# Altium PCB 0.PCB1.PcbDoc (part 5 of 12)
Units mm, origin at the board's own origin, x right, y up, seen from the top; angles counter-clockwise.
Board outline 77 x 72 mm, 6 copper layers (Top Layer, Layer 1, Layer 3, Layer 4, Layer 2, Bottom Layer), stack 1.538 mm thick; 570 components, 490 nets, 3331 pads, 1909 vias.
Unrouted connection lines stored in the file: 2.
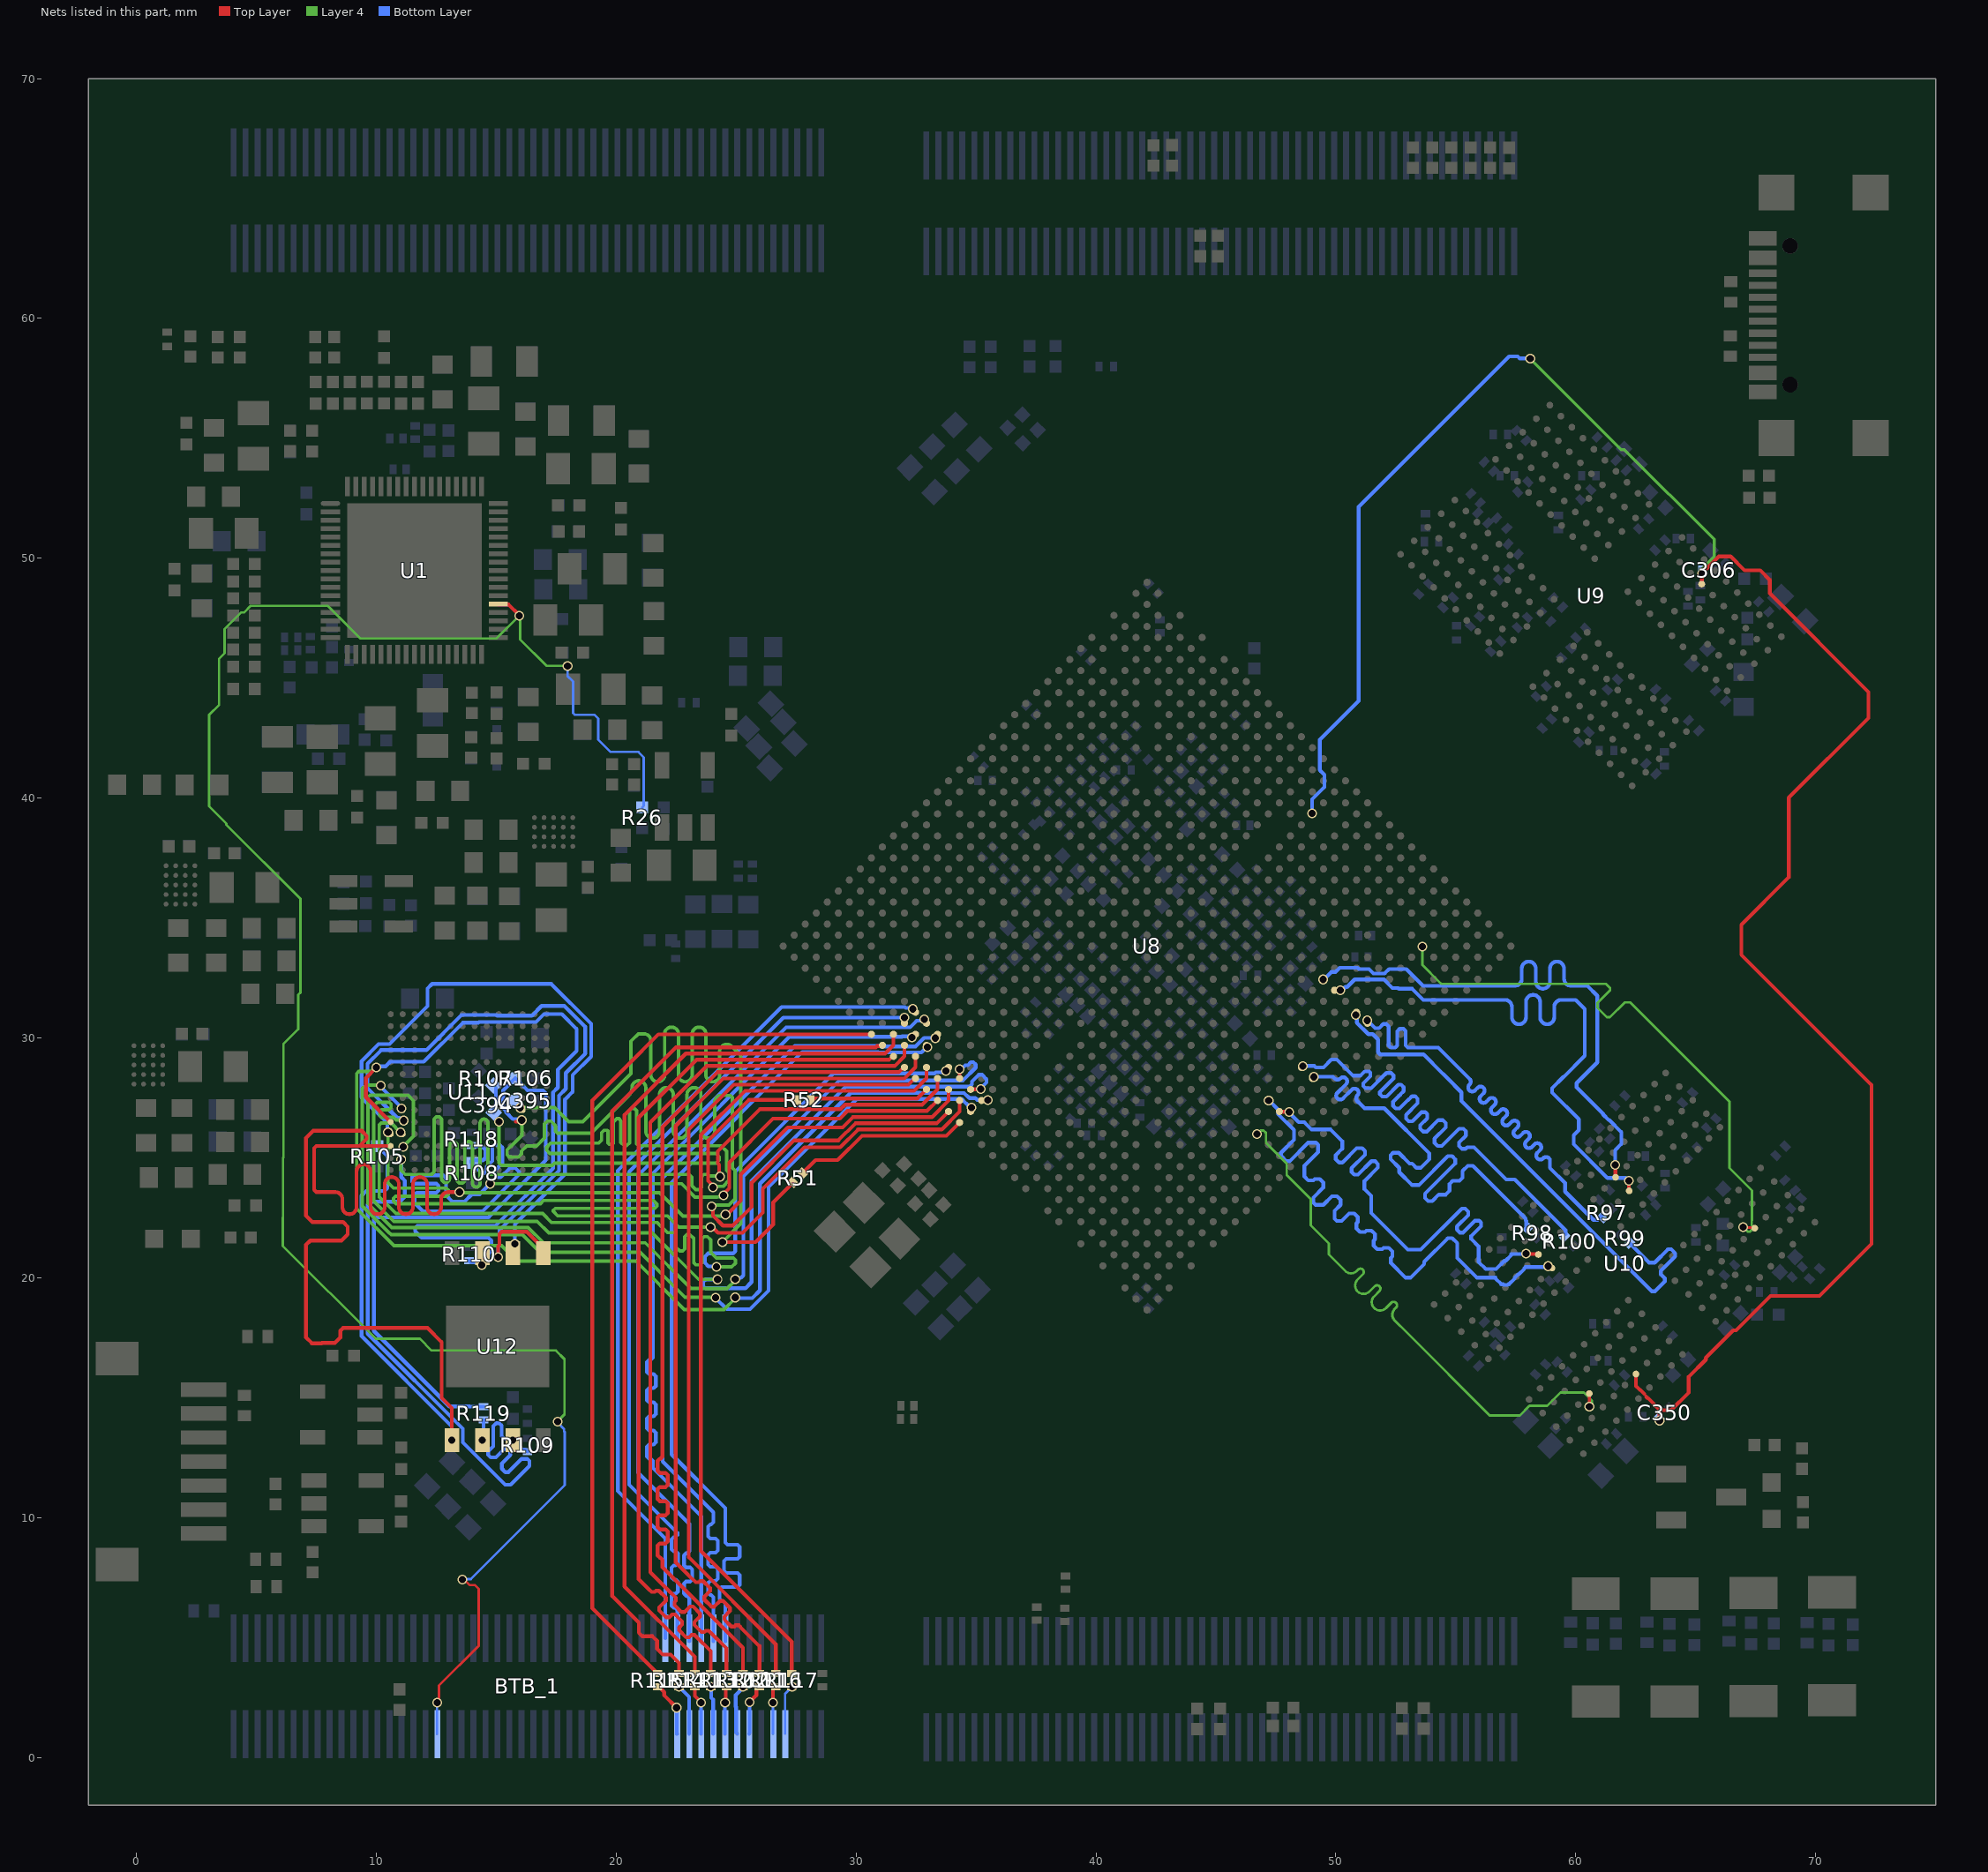
[diagram p9: the nets of this part, all layers, seen from the top]

## Via types
v1: diameter 0.41, hole 0.3, Top Layer to Bottom Layer, tented both sides, 1901 vias
v2: diameter 0.41, hole 0.3, Top Layer to Bottom Layer, 8 vias

## Nets (pads, with @x,y where several pads share a name; then routed paths per layer and width w, separated by ;. In a path a pad name is that pad's centre, name@x,y a point inside that pad or via, vN(x,y) a via of type N, cw(c..) or ccw(c..) an arc to the next point about the centre after c; other vN are vias at no path point) (continued)
DDR_CH1_DQS1P_C: U8.E5 U10.D10 | length 24.3
  Top Layer w0.112: v1(66.981,22.11) 67.004,22.088 U10.D10@67.441,22.088 ; U10.D10@67.443,22.088 U10.D10@67.441,22.088 ; U10.D10@67.463,22.065 U10.D10@67.441,22.088
  Layer 4 w0.105: v1(53.612,33.805) 53.612,33.042 54.331,32.323 54.4,32.254 61.258,32.254 61.437,32.076 61.437,31.989 60.908,31.461 60.908,31.247 61.295,30.861 61.432,30.861 62.049,31.479 62.272,31.479 66.408,27.343 66.408,24.574 67.344,23.638 67.344,22.39 67.342,22.388 67.342,21.997 67.261,21.915 67.177,21.915 67.065,22.027 v1@66.974,22.027
DDR_CH1_DQS1P_D: U8.D21 U10.W10 | length 24.6
  Top Layer w0.112: U10.W10@60.569,15.171 60.571,15.169 60.571,14.63 v1(60.573,14.628)
  Layer 4 w0.105: v1@46.768,26.073 46.814,26.073 v1@46.858,26.118 ; v1@46.855,26.122 46.87,26.137 46.989,26.137 47.092,26.034 47.092,25.62 47.953,24.759 47.953,24.277 48.955,23.275 48.955,22.183 49.709,21.429 49.709,20.964 50.276,20.396 50.385,20.287 ccw(c50.632,20.532) 50.879,20.287 50.929,20.337 cw(c51.028,20.236) 51.128,20.136 ; 50.91,19.919 ccw(c51.156,19.672) 50.91,19.426 ccw(c51.156,19.672) 51.402,19.426 51.62,19.645 cw(c51.72,19.545) 51.819,19.645 ; 50.91,19.919 51.127,20.136 ; 51.82,19.644 cw(c51.72,19.545) 51.819,19.444 51.602,19.227 ccw(c51.847,18.98) 51.602,18.734 ccw(c51.847,18.98) 52.093,18.734 52.312,18.953 cw(c52.412,18.853) 52.511,18.753 ; 52.511,18.752 52.462,18.703 ccw(c52.708,18.457) 52.462,18.21 52.963,17.709 56.412,14.26 57.677,14.26 58.073,14.656 58.816,14.656 59.372,15.212 60.345,15.212 60.675,14.882 v1@60.675,14.73 ; v1@60.548,14.704 v1@60.573,14.73 ; v1@60.599,14.73 v1@60.624,14.755
  other v1: 46.709,25.99
DDR_CH1_LP4/4X_CKE0_C: R97.1 U8.D11 | length 20.3
  Bottom Layer w0.156: v1(51.317,30.725) 51.64,30.402 51.803,30.402 51.978,30.577 52.1,30.577 52.204,30.473 52.204,29.683 52.296,29.591 52.478,29.591 52.565,29.678 52.565,30.277 52.664,30.376 52.818,30.376 52.91,30.285 52.91,29.683 53.002,29.591 53.324,29.591 ; 53.324,29.594 54.274,29.594 55.284,28.583 55.34,28.528 55.576,28.292 cw(c55.458,28.174) 55.576,28.055 55.569,28.048 ccw(c55.687,27.93) 55.569,27.812 ccw(c55.687,27.93) 55.805,27.812 55.917,27.923 cw(c56.035,27.805) 56.153,27.923 cw(c56.035,27.805) 56.153,27.687 56.041,27.575 ccw(c56.159,27.457) 56.041,27.339 ccw(c56.159,27.457) 56.278,27.339 56.389,27.451 cw(c56.508,27.333) 56.626,27.451 cw(c56.508,27.333) 56.626,27.214 56.514,27.103 ccw(c56.632,26.984) 56.514,26.866 ccw(c56.632,26.984) 56.75,26.866 56.862,26.978 cw(c56.98,26.86) 57.099,26.978 cw(c56.98,26.86) 57.099,26.742 56.987,26.63 ccw(c57.105,26.512) 56.987,26.393 ccw(c57.105,26.512) 57.223,26.393 57.335,26.505 cw(c57.453,26.387) 57.571,26.505 cw(c57.453,26.387) 57.571,26.269 57.459,26.157 ccw(c57.578,26.039) 57.459,25.921 ccw(c57.578,26.039) 57.696,25.921 57.808,26.033 cw(c57.926,25.914) 58.044,26.033 cw(c57.926,25.914) 58.044,25.796 57.932,25.684 ccw(c58.05,25.566) 57.932,25.448 ccw(c58.05,25.566) 58.168,25.448 58.28,25.56 cw(c58.399,25.442) 58.517,25.56 cw(c58.399,25.442) 58.517,25.324 58.405,25.212 ccw(c58.523,25.093) 58.405,24.975 ccw(c58.523,25.093) 58.641,24.975 58.649,24.983 cw(c58.767,24.865) 58.885,24.983 58.928,24.939 58.928,24.644 58.928,24.58 59.557,23.951 59.557,23.592 60.736,22.413 60.915,22.413 61.063,22.561 61.086,22.584 R97.1@61.086,22.602
DDR_CH1_LP4/4X_CKE0_D: R98.1 U8.D16 | length 22.9
  Bottom Layer w0.156: v1(49.086,28.37) 49.097,28.381 49.881,28.381 49.899,28.363 49.954,28.308 ccw(c50.072,28.426) 50.191,28.308 ; 50.191,28.309 cw(c50.309,28.19) 50.427,28.309 cw(c50.309,28.19) 50.427,28.072 50.068,27.712 ccw(c50.186,27.594) 50.068,27.476 ccw(c50.186,27.594) 50.304,27.476 50.664,27.836 cw(c50.782,27.718) 50.9,27.836 cw(c50.782,27.718) 50.9,27.599 ; 50.9,27.599 ccw(c51.018,27.481) 50.9,27.363 51.05,27.212 51.105,27.157 51.197,27.065 52.017,27.065 53.9,25.183 53.9,24.939 53.54,24.58 53.361,24.58 53.181,24.76 53.073,24.76 52.625,25.207 52.387,25.207 52.285,25.106 52.285,24.946 52.647,24.584 ; 52.656,24.575 52.647,24.584 ; R98.1@57.941,22.011 57.941,22.367 57.918,22.39 57.918,22.465 55.714,24.67 55.501,24.67 55.284,24.453 55.284,24.168 55.157,24.041 54.872,24.041 54.745,23.914 54.745,23.63 54.581,23.465 54.296,23.465 54.027,23.196 53.847,23.196 53.72,23.323 53.72,23.502 54.977,24.76 54.977,24.939 54.85,25.066 54.67,25.066 53.466,23.862 53.181,23.862 52.642,24.4 52.642,24.58 52.647,24.584
DDR_CH1_LP4/4X_CKE1_C: R99.1 U8.E11 | length 22.5
  Bottom Layer w0.156: v1@50.794,30.91 50.802,30.91 50.875,30.837 50.875,30.636 51.358,30.154 51.544,30.154 51.763,29.934 51.763,29.401 51.855,29.309 53.017,29.309 ; 53.022,29.304 53.017,29.309 ; R99.1@62.248,21.44 63.058,20.63 63.294,20.63 63.85,21.186 63.979,21.186 64.152,21.014 64.152,20.884 63.552,20.284 63.552,20.136 63.715,19.973 63.715,19.843 63.306,19.434 63.177,19.434 61.102,21.508 58.448,24.162 55.239,27.371 55.239,27.73 54.648,28.322 54.648,28.326 54.466,28.508 54.462,28.508 53.66,29.309 53.017,29.309
  other v1: 50.827,30.954
DDR_CH1_LP4/4X_CKE1_D: R100.1 U8.E16 | length 24.2
  Bottom Layer w0.156: v1(48.621,28.821) 48.631,28.83 49.106,28.83 49.165,28.771 49.487,28.771 49.814,29.098 50.046,29.098 50.72,28.423 51.023,28.423 51.206,28.606 51.389,28.606 51.442,28.552 51.442,28.403 51.148,28.109 51.148,27.995 51.241,27.903 51.475,27.903 51.942,28.37 ; 51.935,28.362 51.942,28.37 ; 52.626,27.577 52.678,27.629 ; 53.022,27.407 53.055,27.44 ; R100.1@59.578,21.811 59.578,21.983 57.466,24.095 57.107,24.095 55.76,25.442 55.48,25.442 55.407,25.37 55.265,25.37 55.138,25.497 55.138,25.639 55.426,25.927 55.426,26.107 55.321,26.212 55.142,26.212 54.423,25.493 54.244,25.493 54.116,25.62 54.116,25.8 54.583,26.267 54.583,26.446 54.456,26.574 54.277,26.574 53.792,26.089 53.65,26.089 53.522,26.216 53.522,26.358 53.81,26.645 53.81,26.825 53.734,26.901 53.576,26.901 53.195,26.52 53.037,26.52 52.925,26.632 52.925,26.79 53.41,27.275 53.41,27.465 53.31,27.566 53.18,27.566 53.055,27.44 ; 51.942,28.37 52.112,28.54 52.306,28.54 52.408,28.437 52.408,28.308 51.836,27.736 51.836,27.658 51.937,27.557 52.115,27.557 52.61,28.052 52.722,28.052 52.829,27.945 52.829,27.78 52.678,27.629 ; 52.678,27.629 52.678,27.62 52.387,27.328 52.387,27.171 52.498,27.059 52.656,27.059 53.037,27.44 53.055,27.44
DDR_CH1_LP4/4X_CS0_C: U8.G11 U10.H4 | length 24.5
  Top Layer w0.156: v1(62.214,24.046) 62.209,24.041 62.218,24.032 62.218,23.633 U10.H4@62.23,23.621
  Bottom Layer w0.156: v1(50.193,31.987) 50.261,31.987 50.4,32.126 50.477,32.126 50.785,32.434 52.006,32.434 52.359,32.081 52.594,32.081 52.629,32.047 53.186,32.047 53.648,31.585 56.381,31.585 57.048,31.585 cw(c57.048,31.291) 57.342,31.291 57.342,30.863 ccw(c57.636,30.863) 57.93,30.863 57.93,31.5 cw(c58.224,31.5) 58.518,31.5 58.518,30.863 ccw(c58.812,30.863) 59.106,30.863 59.106,31.291 cw(c59.401,31.291) 59.401,31.585 60,31.585 60.197,31.387 60.383,31.202 60.383,29.256 59.494,28.367 ; 59.488,28.373 59.018,27.903 59.018,27.723 60.132,26.609 60.132,26.161 59.917,25.946 59.917,25.567 61.322,24.162 62.095,24.162 62.211,24.046 62.212,24.045 v1(62.214,24.046)
DDR_CH1_LP4/4X_CS0_D: U8.E19 U10.R4 | length 24.4
  Bottom Layer w0.156: v1(47.201,27.388) 47.227,27.388 47.602,27.013 47.602,26.818 48.256,26.164 48.256,25.753 47.714,25.211 47.714,25.082 47.94,24.856 48.07,24.856 48.849,25.634 49.166,25.634 49.258,25.542 49.258,25.236 48.691,24.67 48.691,24.221 48.853,24.059 49.063,24.059 49.122,24.118 49.333,24.118 49.481,23.969 49.481,23.759 49.064,23.342 49.064,23.132 49.156,23.041 49.481,23.041 49.84,23.4 50.051,23.4 50.2,23.251 50.2,23.04 49.946,22.787 49.946,22.457 50.037,22.365 50.243,22.365 50.559,22.681 50.769,22.681 50.918,22.533 50.918,22.322 50.859,22.263 50.859,22.053 51.008,21.904 51.218,21.904 51.277,21.963 51.488,21.963 51.637,21.814 51.637,21.604 51.578,21.545 51.578,21.334 51.726,21.185 51.937,21.185 51.996,21.244 52.206,21.244 52.355,21.096 52.355,20.885 52.296,20.826 52.296,20.616 52.912,20 53.115,20 53.684,20.569 53.684,20.665 54.672,21.652 54.851,21.652 55.062,21.442 55.062,20.824 55.886,20 56.666,20 56.666,19.963 56.897,19.732 56.975,19.732 57.003,19.704 57.166,19.704 57.194,19.732 57.224,19.732 57.455,19.963 57.455,19.992 57.599,20.137 57.627,20.137 57.858,20.368 57.858,20.396 57.911,20.449 58.812,20.449 v1(58.846,20.483)
DDR_CH1_LP4/4X_CS1_C: U8.H11 U10.H3 | length 24.4
  Top Layer w0.156: v1(61.647,24.701) 61.656,24.692 61.656,24.188 U10.H3@61.691,24.153
  Bottom Layer w0.156: v1@49.49,32.493 49.561,32.493 49.817,32.748 49.989,32.748 50.166,32.925 50.918,32.925 50.973,32.87 51.383,32.87 51.572,32.682 52.034,32.682 52.223,32.87 52.937,32.87 53.638,32.169 57.378,32.169 57.456,32.169 ccw(c57.456,32.464) 57.75,32.464 57.75,32.891 cw(c58.044,32.891) 58.339,32.891 58.339,32.346 ccw(c58.633,32.346) 58.927,32.346 58.927,32.891 cw(c59.221,32.891) 59.515,32.891 59.515,32.464 ccw(c59.809,32.464) 59.809,32.169 60.228,32.169 60.489,32.169 60.905,31.754 60.905,28.978 60.703,28.776 ; 60.701,28.777 60.04,28.116 60.04,27.936 61.144,26.832 61.144,26.809 61.375,26.578 61.398,26.578 61.907,26.069 61.907,25.58 61.647,25.32 v1@61.647,24.696
  other v1: 49.478,32.437
DDR_CH1_LP4/4X_CS1_D: U8.D19 U10.R3 | length 23.2
  Top Layer w0.156: U8.D19@47.646,26.931 47.654,26.923 48.048,26.923 v1(48.056,26.915) ; v1@57.881,21.004 57.898,20.986 58.43,20.986 U10.R3@58.447,20.969
  Bottom Layer w0.156: v1(48.056,26.915) 48.056,26.884 48.45,26.49 48.686,26.49 48.997,26.179 49.787,26.179 50.268,25.697 50.268,25.377 49.997,25.106 49.997,24.946 50.143,24.8 50.272,24.8 50.87,25.398 51.1,25.398 51.218,25.28 51.218,25.128 50.657,24.568 50.657,24.41 50.769,24.298 50.927,24.298 51.487,24.859 51.639,24.859 51.757,24.741 51.757,24.59 51.196,24.029 51.196,23.692 51.475,23.413 51.475,22.694 53.002,21.168 53.54,21.168 55.256,22.883 55.392,22.883 55.519,22.756 55.519,22.604 55.05,22.135 55.05,22.006 55.174,21.881 55.304,21.881 55.798,22.375 55.976,22.375 56.052,22.299 56.052,22.147 55.647,21.742 55.647,21.612 55.95,21.308 55.95,20.661 56.252,20.359 56.683,20.359 57.025,20.701 57.076,20.701 57.307,20.932 57.307,20.983 57.309,20.985 v1@58.028,20.985
  other v1: 57.932,21.004
DDR_RESET: C306.2 C350.2 U8.T4 U9.T11 U10.T11 | length 88.1
  Top Layer w0.156: U10.T11@62.513,15.984 62.513,15.482 62.675,15.321 62.695,15.321 62.857,15.159 62.859,15.162 ; 62.935,15.035 62.969,15.001 62.978,15.001 63.011,14.969 63.022,14.969 63.487,14.503 63.487,14.051 v1(63.494,14.044) ; 63.494,14.476 63.977,14.476 64.713,15.212 64.713,15.873 65.425,16.584 65.425,16.66 66.568,17.803 66.684,17.803 68.117,19.236 70.16,19.236 72.336,21.412 72.336,28.037 66.91,33.462 66.91,34.719 68.882,36.69 68.882,40.013 72.206,43.338 72.206,44.422 68.092,48.537 68.092,49.096 67.693,49.495 67.042,49.495 66.461,50.075 65.973,50.075 65.695,49.798 65.69,49.798 65.508,49.617 65.508,49.611 v1@65.27,49.372 ; U9.T11@65.252,48.923 65.263,48.933 v1@65.263,49.366
  Layer 4 w0.127: v1(58.109,58.318) 61.902,54.524 62.03,54.524 65.77,50.785 65.77,50.066 65.274,49.57 v1(65.274,49.368)
  Bottom Layer w0.156: v1(49.015,39.356) 49.015,39.951 49.524,40.46 49.524,40.968 49.372,41.12 ; 49.378,41.127 49.334,41.171 49.334,42.434 50.95,44.05 50.95,52.146 57.223,58.419 57.581,58.419 57.669,58.331 58.096,58.331 v1(58.109,58.318)
EMMC_CLKOUT: C395.2 R51.2 U11.M6 | length 36.1
  Top Layer w0.156: v1(15.999,27.082) 16.091,26.991 U11.M6@16.102,26.991 ; v1(24.429,21.486) 25.813,21.486 26.549,22.222 26.549,23.144 R51.2@27.379,23.974 27.344,24.009 27.242,24.009 R51.2@27.207,23.974
  Layer 4 w0.142: v1(15.999,27.082) 16.012,27.094 17.439,27.094 18.028,26.505 18.61,26.505 20.616,28.512 20.616,29.858 20.658,29.899 20.926,30.168 21.16,30.168 cw(c21.16,29.881) 21.447,29.881 21.447,28.456 ccw(c21.734,28.456) 22.021,28.456 22.021,30.162 cw(c22.308,30.162) 22.595,30.162 22.595,28.456 ccw(c22.883,28.456) 23.17,28.456 23.17,30.162 cw(c23.457,30.162) 23.744,30.162 23.744,28.456 ccw(c24.031,28.456) 24.318,28.456 24.318,29.443 cw(c24.605,29.443) 24.808,29.646 24.988,29.467 25.192,29.262 25.192,22.25 v1(24.429,21.486)
EMMC_CLKOUT_R: R51.1 U8.V34 | length 7.4
  Top Layer w0.156: R51.1@27.768,24.363 28.311,24.906 29.233,24.906 30.248,25.921 33.766,25.921 U8.V34@34.317,26.472
EMMC_D4: U8.Y32 U11.B3 | length 43
  Top Layer w0.156: U8.Y32@34.317,28.31 v1(34.317,28.691)
  Layer 4 w0.142: v1(11.128,25.453) 11.128,25.479 11.551,25.902 11.551,27.379 11.323,27.608 9.735,27.608 9.652,27.524 9.652,23.095 10.651,22.096 16.326,22.096 16.966,21.456 21.213,21.456 23.121,19.548 24.122,19.548 ; 24.122,19.552 24.628,19.552 24.966,19.89 v1(24.966,19.944)
  Bottom Layer w0.156: v1(24.966,19.944) 25.015,19.992 25.206,19.992 25.308,20.094 25.308,24.226 29.309,28.228 34.458,28.228 34.99,28.76 34.99,28.885 34.891,28.984 34.782,28.984 34.661,28.863 34.558,28.863 34.384,28.69 v1@34.332,28.69 ; v1(34.317,28.691) v1@34.355,28.691
EMMC_D5: U8.AA32 U11.B4 | length 40.8
  Layer 4 w0.142: v1(11.017,26.066) 10.999,26.066 10.621,26.444 10.203,26.444 10.12,26.361 10.12,23.381 10.821,22.68 16.931,22.68 17.309,22.302 21.724,22.302 ; 21.752,22.263 22.138,21.877 22.41,21.877 22.499,21.788 22.499,21.265 22.65,21.114 22.768,21.114 22.852,21.197 22.852,21.705 22.949,21.802 23.067,21.802 23.238,21.631 23.238,20.62 23.321,20.536 23.497,20.536 23.581,20.62 23.581,21.631 23.664,21.715 23.804,21.715 23.944,21.575 23.944,21.052 24.172,20.823 24.889,20.823 24.973,20.74 24.973,20.605 24.816,20.449 v1(24.188,20.449)
  Bottom Layer w0.156: v1(24.188,20.449) v1@24.266,20.449 ; v1@24.266,20.468 24.259,20.475 23.842,20.475 23.7,20.618 23.7,20.882 23.835,21.016 24.876,21.016 24.967,21.108 24.967,24.43 29.057,28.52 33.273,28.52 33.319,28.566 33.688,28.566 v1(33.744,28.622)
EMMC_D7: U8.V33 U11.B6 | length 40.5
  Layer 4 w0.142: v1(10.181,28.017) 10.161,28.037 9.576,28.037 9.418,27.88 9.418,22.998 10.523,21.893 10.625,21.792 16.09,21.792 16.82,21.062 20.995,21.062 22.867,19.19 24.131,19.19 v1(24.15,19.171)
  Bottom Layer w0.156: v1(10.181,28.017) 10.181,27.954 11.047,27.089 v1(11.047,27.062) ; v1(24.15,19.171) 24.15,19.149 24.612,18.687 25.579,18.687 26.357,19.464 26.357,23.777 30.033,27.454 32.254,27.454 34.401,27.454 34.58,27.275 34.582,27.275 34.761,27.097 v1(34.808,27.097)
EMMC_DATA_STROBE: R108.2 R118.1 U8.Y34 | length 40.7
  Top Layer w0.156: v1(24.478,23.43) 24.478,23.498 24.713,23.734 24.713,24.806 26.54,26.633 29.328,26.633 29.648,26.953 32.96,26.953 U8.Y34@33.398,27.391
  Layer 4 w0.142: v1(14.749,23.92) 22.732,23.92 23.286,23.365 24.201,23.365 24.206,23.371 24.419,23.371 v1(24.478,23.43)
  Bottom Layer w0.156: R108.2@13.967,24.872 13.967,24.814 R108.2@13.992,24.789 ; R118.1@13.967,25.509 14,25.476 14.402,25.476 14.559,25.319 14.559,25.177 14.556,25.174 14.556,25.009 14.442,24.895 14.002,24.895 R108.2@13.979,24.872 ; R108.2@14.011,24.77 14.306,24.475 ; 14.292,24.461 14.392,24.361 14.521,24.361 14.613,24.452 14.613,24.642 14.835,24.865 14.835,25.479 14.886,25.53 15.155,25.53 15.261,25.425 15.261,25.102 15.262,25.101 15.262,24.788 14.928,24.454 14.928,24.325 15.067,24.186 15.181,24.186 15.569,24.575 15.798,24.575 15.949,24.424 15.949,24.294 14.414,22.759 11.996,22.759 11.98,22.774 11.942,22.774 11.594,23.122 11.594,23.454 11.686,23.546 12.503,23.546 12.595,23.638 12.595,23.831 12.501,23.925 11.572,23.925 11.493,24.004 11.493,24.219 11.546,24.273 12.791,24.273 12.908,24.156 12.908,23.442 13.169,23.18 13.682,23.18 13.982,23.48 14.31,23.48 v1(14.749,23.92) v1@14.701,23.968
EMMC_RSTN: C394.2 R52.2 R107.2 U11.K5 | length 41.6
  Top Layer w0.156: v1(24.037,23.763) 24.037,23.832 23.829,24.04 23.829,25.72 25.521,27.412 R52.2@27.558,27.412
  Layer 4 w0.142: v1(15.11,26.509) 15.116,26.503 15.116,24.787 15.2,24.703 ; 15.237,24.682 17.337,24.682 17.429,24.773 24.157,24.773 24.292,24.908 24.292,25.045 24.155,25.182 17.233,25.182 17.095,25.32 17.095,25.438 17.271,25.614 19.278,25.614 19.392,25.728 19.392,26.048 19.489,26.145 19.631,26.145 19.656,26.119 19.656,25.614 19.705,25.565 19.847,25.565 19.885,25.604 19.885,26.493 20.025,26.632 20.114,26.632 20.197,26.549 20.197,25.644 20.335,25.507 20.434,25.507 20.556,25.629 20.556,26.975 20.639,27.058 20.757,27.058 20.848,26.968 20.848,25.585 20.931,25.502 24.366,25.502 24.601,25.266 24.601,24.473 24.704,24.37 24.704,24.057 24.456,23.808 24.083,23.808 v1(24.037,23.763)
  Bottom Layer w0.156: C394.2@14.895,26.884 14.895,27.127 14.983,27.215 R107.2@14.983,27.913
EMMC_RSTN_R: R52.1 U8.AA34 | length 5
  Top Layer w0.156: R52.1@28.108,27.412 28.165,27.469 32.238,27.469 32.557,27.469 U8.AA34@32.938,27.85
EXT_PWR_EN: BTB_1.83 R26.2 U1.39 | length 87.1
  Top Layer w0.102: v1@12.618,2.335 12.608,2.345 12.608,2.449 12.618,2.459 12.618,2.995 14.269,4.646 14.269,7.025 14.107,7.186 13.888,7.186 13.66,7.415 v1(13.583,7.415)
  Top Layer w0.156: U1.39@15.091,48.089 15.112,48.067 15.517,48.067 15.957,47.626 v1(15.957,47.602)
  Layer 4 w0.102: v1(17.561,14.004) 17.561,14.017 17.847,14.302 17.847,16.602 17.484,16.965 12.305,16.965 11.818,17.451 9.979,17.451 6.105,21.325 6.105,22.503 6.116,22.513 6.116,25.003 6.127,25.014 6.127,29.737 6.751,30.361 6.751,31.802 6.836,31.886 6.836,35.804 3.753,38.886 3.753,38.936 3.033,39.657 3.033,43.473 3.449,43.889 3.449,45.81 3.674,46.035 3.674,47.046 4.363,47.735 4.48,47.735 4.76,48.015 6.993,48.015 7.975,48.015 9.335,46.655 15.01,46.655 15.963,47.608 16.001,47.57 16.001,46.614 17.103,45.512 17.967,45.512 v1(17.976,45.503)
  Bottom Layer w0.102: BTB_1.83@12.535,0.98 v1@12.535,2.282 ; v1(13.583,7.415) 13.603,7.434 13.944,7.434 17.859,11.35 17.859,13.567 17.829,13.597 17.829,13.691 17.561,13.959 v1(17.561,14.004) ; v1(17.976,45.503) 17.976,45.087 18.206,44.857 18.206,43.549 18.285,43.469 19.1,43.469 19.255,43.315 19.255,42.436 19.768,41.923 20.928,41.923 21.15,41.701 21.15,40.071 21.15,39.669 R26.2@21.085,39.604
  other v1: 12.541,2.288
FSPI_CLK_M0: R106.2 R119.2 U8.W34 U11.M5 | length 68.8
  Top Layer w0.156: 15.811,26.509 16.084,26.509 U11.M5@16.102,26.491 ; v1(23.975,22.968) 24.031,22.912 24.031,22.589 24.447,22.174 24.868,22.174 25.648,22.954 25.648,23.96 27.416,25.728 29.264,25.728 29.973,26.437 33.363,26.437 U8.W34@33.857,26.931
  Layer 4 w0.142: v1(16.063,26.571) 16.072,26.562 16.072,25.931 15.63,25.489 15.623,25.489 15.455,25.322 15.455,25.126 15.544,25.037 15.933,25.037 16.06,25.164 16.06,25.284 16.276,25.499 16.687,25.499 17.016,25.828 17.016,26.41 17.137,26.531 17.276,26.531 17.474,26.333 17.474,26.104 17.558,26.02 18.955,26.02 20.445,27.51 20.516,27.581 ccw(c20.17,27.928) 20.66,27.922 cw(c20.947,27.923) 21.234,27.923 21.234,26.107 ccw(c21.521,26.107) 21.809,26.107 21.809,27.637 cw(c22.096,27.637) 22.383,27.637 22.383,26.107 ccw(c22.67,26.107) 22.957,26.107 22.957,27.637 cw(c23.244,27.637) 23.531,27.637 23.531,26.107 ccw(c23.819,26.107) 24.106,26.107 24.106,27.31 cw(c24.393,27.31) 24.393,27.597 24.762,27.597 24.822,27.537 24.845,27.514 24.845,24.574 24.948,24.471 24.948,23.287 24.694,23.032 24.394,23.032 24.388,23.026 24.034,23.026 v1(23.975,22.968)
  Bottom Layer w0.156: R119.2@14.472,14.619 13.895,14.619 13.882,14.632 13.045,14.632 9.9,17.777 9.9,22.419 9.992,22.511 14.68,22.511 17.065,24.896 17.065,27.7 16.954,27.811 16.305,27.811 R106.2@15.796,28.319 15.288,27.811 15.288,27.084 15.418,26.954 15.418,26.892 15.691,26.62 16.015,26.62 v1(16.063,26.571)
FSPI_CLK_M0_R: R119.1 U12.6 | length 0.9
  Top Layer w0.156: U12.6@14.421,13.229 v1(14.421,13.231)
  Bottom Layer w0.156: v1(14.421,13.231) 14.421,13.27 14.472,13.321 R119.1@14.472,14.069
FSPI_CS0N_M0: U8.W32 U11.B5 U12.1 | length 70.1
  Top Layer w0.156: v1(15.083,20.854) 15.083,21.321 15.133,21.372 15.133,21.822 15.225,21.913 16.277,21.913 16.961,21.229 U12.1@16.961,21.029 ; U8.W32@34.739,27.864 34.745,27.858 35.193,27.858 v1(35.201,27.865)
  Layer 4 w0.142: v1(11.14,26.552) 11.12,26.572 10.824,26.572 10.7,26.696 10.467,26.696 10.456,26.686 10.228,26.686 10.144,26.769 10.144,26.922 10.228,27.006 10.528,27.006 10.619,27.097 10.619,27.235 10.536,27.318 10.042,27.318 9.886,27.161 9.886,23.192 10.728,22.35 16.707,22.35 17.19,21.867 21.5,21.867 23.438,19.93 v1(24.226,19.93)
  Bottom Layer w0.156: v1(11.14,26.552) 11.071,26.552 10.964,26.66 10.875,26.66 9.632,27.903 9.632,28.922 10.2,29.491 12.088,29.491 13.553,30.956 15.008,30.956 15.034,30.93 16.489,30.93 16.892,31.334 17.84,31.334 18.709,30.465 18.709,29.342 17.903,28.536 17.903,27.875 17.62,27.592 17.62,24.464 15.133,21.977 15.133,21.372 15.083,21.321 v1(15.083,20.854) ; v1@24.145,19.914 24.129,19.93 23.736,19.93 23.629,19.823 23.629,19.651 23.721,19.559 25.385,19.559 25.643,19.817 25.643,24.039 29.574,27.97 31.738,27.97 34.743,27.97 34.834,28.061 34.834,28.18 35.121,28.467 35.251,28.467 35.442,28.276 35.442,28.146 v1@35.31,28.014
FSPI_D0_M0: R105.2 U8.Y33 U11.A3 U12.5 | length 85.3
  Top Layer w0.156: U11.A3@10.602,25.491 9.302,25.491 ; v1(13.151,13.229) 13.151,14.567 12.727,14.992 12.727,17.314 12.133,17.907 8.618,17.907 8.503,17.793 8.503,17.506 8.278,17.28 7.744,17.28 7.731,17.267 7.312,17.267 7.071,17.509 7.071,21.369 7.251,21.55 8.551,21.55 8.808,21.806 8.808,22.131 8.618,22.322 7.337,22.322 7.071,22.589 7.071,25.827 7.37,26.127 9.406,26.127 9.406,26.108 9.598,25.916 9.598,25.786 9.302,25.491 ; v1(13.471,23.57) 13.078,23.57 13,23.57 ccw(c12.999,23.276) 12.705,23.276 12.705,22.943 cw(c12.411,22.943) 12.117,22.943 12.117,23.902 ccw(c11.823,23.902) 11.529,23.902 11.529,22.943 cw(c11.235,22.943) 10.941,22.943 10.941,23.902 ccw(c10.646,23.902) 10.352,23.902 10.352,22.943 cw(c10.058,22.943) 9.764,22.943 9.764,24.432 ccw(c9.47,24.432) 9.176,24.432 9.176,22.943 cw(c8.882,22.943) 8.588,22.943 8.588,23.276 ccw(c8.293,23.276) 8.293,23.57 7.576,23.57 7.497,23.57 7.406,23.662 7.406,25.399 7.498,25.491 9.302,25.491 ; v1(24.559,22.634) 24.619,22.634 25.196,23.211 25.196,24.308 27.156,26.268 29.439,26.268 29.866,26.695 33.168,26.695 33.857,27.384 U8.Y33@33.857,27.85
  Layer 4 w0.142: v1(13.471,23.57) 13.474,23.567 13.474,23.544 21.815,23.544 22.789,22.57 24.049,22.57 24.054,22.575 24.5,22.575 v1(24.559,22.634)
  Bottom Layer w0.156: R105.2@10.039,25.491 10.459,25.071 10.459,23.734 10.345,23.62 9.578,23.62 9.384,23.426 9.384,17.563 13.151,13.796 v1(13.151,13.229)
FSPI_D1_M0: U8.W33 U11.A4 U12.2 | length 69.4
  Top Layer w0.156: v1(23.937,22.112) 24.005,22.112 24.246,21.871 25.263,21.871 26.11,22.718 26.11,23.704 27.847,25.441 29.342,25.441 30.08,26.179 33.572,26.179 34.317,26.924 34.317,27.367 U8.W33@34.312,27.371
  Layer 4 w0.142: v1(10.487,26.058) 10.487,23.967 10.718,23.737 12.918,23.737 13.012,23.643 13.012,23.48 12.928,23.396 10.802,23.396 10.719,23.313 10.719,23.195 10.827,23.086 16.839,23.086 16.974,23.221 21.546,23.221 21.701,23.066 21.701,22.987 21.605,22.891 17.461,22.891 17.378,22.807 17.378,22.766 17.566,22.578 22.143,22.578 22.61,22.112 v1(23.937,22.112)
  Bottom Layer w0.156: v1(10.487,26.058) 10.459,26.086 10.459,26.446 9.384,27.521 9.384,29.025 10.097,29.739 10.55,29.739 12.138,31.326 12.138,32.063 12.328,32.253 17.29,32.253 18.957,30.587 18.957,29.217 18.188,28.448 18.188,27.75 17.868,27.43 17.868,24.315 15.78,22.227 v1(15.78,21.414)
FSPI_D2_M0: R110.2 U8.V32 U11.A5 U12.3 | length 71.8
  Top Layer w0.156: v1(10.006,28.767) 9.568,28.329 9.568,27.525 U11.A5@10.602,26.491
  Layer 4 w0.142: v1(10.006,28.767) 9.94,28.767 9.771,28.598 9.268,28.598 9.184,28.515 9.184,22.887 10.737,21.334 15.225,21.334 15.868,20.691 20.827,20.691 22.843,18.676 24.498,18.676 24.962,19.14 v1(24.962,19.174)
  Bottom Layer w0.156: v1(10.006,28.767) 10.055,28.816 10.393,28.816 10.581,29.004 11.978,29.004 13.604,30.63 14.249,30.63 14.282,30.663 16.659,30.663 16.987,30.991 17.734,30.991 18.351,30.374 18.351,29.454 17.571,28.674 17.571,27.93 17.372,27.731 17.372,24.566 14.965,22.159 11.714,22.159 11.623,22.068 11.623,21.938 11.886,21.674 14.673,21.674 14.801,21.546 14.801,21.117 14.671,20.986 14.671,20.864 14.409,20.602 v1@14.409,20.526 ; R110.2@13.868,20.708 13.94,20.637 14.222,20.637 14.355,20.503 v1@14.409,20.503 ; v1(24.962,19.174) 24.989,19.147 25.675,19.147 25.996,19.468 25.996,23.922 29.786,27.712 32.658,27.712 32.667,27.703 34.502,27.703 34.682,27.523 34.702,27.523 34.734,27.491 34.973,27.491 35.052,27.413 35.488,27.413 v1(35.497,27.404)
  other v1: 14.401,20.526
FSPI_D3_M0: R109.2 U8.AA33 U11.B2 U12.7 | length 68.7
  Top Layer w0.156: v1(24.326,24.213) 24.291,24.249 24.291,24.71 24.234,24.767 24.234,25.269 25.997,27.032 29.362,27.032 29.541,27.211 32.751,27.211 33.398,27.858 U8.AA33@33.398,28.31
  Layer 4 w0.142: v1@11.036,24.885 11.036,24.478 11.208,24.306 12.178,24.306 12.249,24.306 ccw(c12.249,24.466) 12.409,24.466 12.409,26.554 cw(c12.569,26.554) 12.729,26.554 12.729,24.131 ccw(c12.89,24.131) 13.05,24.131 13.05,25.51 cw(c13.21,25.51) 13.37,25.51 13.37,24.098 ccw(c13.53,24.098) 13.69,24.098 13.69,25.512 cw(c13.851,25.512) 14.011,25.512 14.011,23.938 ccw(c14.171,23.938) 14.331,23.938 14.331,26.452 cw(c14.491,26.452) 14.651,26.452 14.651,24.466 ccw(c14.811,24.466) 14.811,24.306 15.098,24.306 23.037,24.306 23.159,24.184 23.159,23.838 23.319,23.678 23.474,23.678 23.558,23.761 23.558,24.212 23.652,24.306 23.801,24.306 23.858,24.249 24.291,24.249 v1(24.326,24.213) ; v1(11.039,24.927) v1@11.058,24.908
  Bottom Layer w0.156: v1(11.039,24.927) 11.039,24.195 11.193,24.042 11.193,23.388 10.973,23.169 9.75,23.169 9.642,23.061 9.642,17.67 13.609,13.703 13.609,13.13 15.369,11.369 15.603,11.369 16.385,12.152 16.385,12.357 16.293,12.449 16.062,12.449 15.507,11.894 15.378,11.894 15.234,12.037 15.234,12.253 15.588,12.608 15.588,12.737 15.468,12.858 15.336,12.858 14.988,12.51 14.772,12.51 14.661,12.62 14.661,12.75 14.879,12.967 14.879,13.813 14.995,13.93 15.13,13.93 15.222,13.838 15.222,13.389 15.333,13.277 15.617,13.277 v1@15.643,13.252 ; v1(15.691,13.229) 16.1,12.82 16.229,12.82 R109.2@16.301,12.749
GMAC0_MCLKINOUT: BTB_1.63 R115.2 | length 2.3
  Top Layer w0.156: R115.2@21.751,2.97 22.007,2.715 22.007,2.582 v1(22.517,2.072)
  Bottom Layer w0.156: v1(22.517,2.072) 22.53,2.058 22.53,0.985 BTB_1.63@22.535,0.98
GMAC0_MCLKINOUT_R: R115.1 U8.AF34 | length 37.8
  Top Layer w0.156: R115.1@21.73,3.492 19.004,6.218 19.004,21.893 19.004,27.392 20.419,28.807 21.761,30.149 29.559,30.149 U8.AF34@30.64,30.149
GMAC0_MDC: BTB_1.55 R116.2 | length 2
  Top Layer w0.156: v1(26.541,2.288) 26.541,2.826 R116.2@26.657,2.942
  Bottom Layer w0.102: BTB_1.55@26.535,0.98 v1@26.535,2.282
GMAC0_MDC_R: R116.1 U8.AB34 | length 34.5
  Top Layer w0.156: R116.1@26.657,3.492 26.657,4.717 23.027,8.347 23.027,26.176 24.905,28.054 31.654,28.054 32.183,28.054 32.44,28.31 U8.AB34@32.479,28.31
GMAC0_MDIO: BTB_1.54 R117.2 | length 2.1
  Bottom Layer w0.102: BTB_1.54@27.044,0.988 27.044,2.655 v1(27.338,2.949)
GMAC0_MDIO_R: R117.1 U8.AB33 | length 34.9
  Top Layer w0.156: R117.1@27.318,3.492 27.318,4.821 23.532,8.606 23.532,25.951 25.376,27.796 31.912,27.796 32.416,27.796 32.938,28.317 U8.AB33@32.938,28.761
GMAC0_RXCLK: BTB_1.38 U8.AE32 | length 35.3
  Bottom Layer w0.156: BTB_1.38@22.551,4.995 22.551,6.065 22.551,6.144 22.459,6.235 22.397,6.235 22.309,6.324 22.309,6.735 22.397,6.824 22.483,6.824 22.571,6.912 22.571,7.324 22.483,7.412 22.397,7.412 22.309,7.5 22.309,7.912 22.397,8 22.483,8 22.571,8.088 22.571,8.5 22.483,8.588 22.397,8.588 22.309,8.677 22.309,9.088 22.397,9.177 22.459,9.177 22.551,9.268 22.551,9.352 22.551,9.361 20.54,11.372 20.54,24.417 26.972,30.849 v1(32.015,30.849)
GMAC0_RXD0: BTB_1.40 U8.AD32 | length 35.4
  Bottom Layer w0.156: BTB_1.40@23.551,4.843 23.551,10.048 21.533,12.065 21.533,12.284 21.533,12.362 21.442,12.454 21.368,12.454 21.279,12.542 21.279,12.954 21.368,13.042 21.561,13.042 21.65,13.13 21.65,13.542 21.561,13.63 21.368,13.63 21.279,13.718 21.279,14.13 21.368,14.218 21.561,14.218 21.65,14.307 21.65,14.718 21.561,14.807 21.368,14.807 21.279,14.895 21.279,15.307 21.368,15.395 21.561,15.395 21.65,15.483 21.65,15.895 21.561,15.983 21.368,15.983 21.279,16.072 21.279,16.483 21.368,16.572 21.442,16.572 21.533,16.663 21.533,17.149 21.533,24.356 27.221,30.044 31.905,30.044 31.925,30.064 32.291,30.064 v1(32.331,30.024)
GMAC0_RXD1: BTB_1.39 U8.AD31 | length 35.6
  Bottom Layer w0.156: BTB_1.39@23.051,4.843 23.051,6.574 23.051,6.652 22.959,6.744 22.918,6.744 22.829,6.832 22.829,7.244 22.918,7.332 23.083,7.332 23.171,7.42 23.171,7.832 23.083,7.92 22.918,7.92 22.829,8.009 22.829,8.42 22.918,8.509 22.959,8.509 23.051,8.6 23.051,8.76 23.051,9.732 20.911,11.872 20.911,24.26 27.093,30.442 32.252,30.442 32.527,30.717 32.791,30.717 v1(32.84,30.766)
GMAC0_RXD2: BTB_1.42 U8.AC32 | length 35.5
  Bottom Layer w0.156: BTB_1.42@24.551,4.843 24.551,6.343 24.551,6.421 24.459,6.513 24.397,6.513 24.309,6.601 24.309,7.013 24.397,7.101 25.062,7.101 25.15,7.189 25.15,7.601 25.062,7.689 24.584,7.689 24.496,7.777 24.496,8.189 24.584,8.277 25.062,8.277 25.15,8.366 25.15,8.777 25.062,8.866 24.643,8.866 24.551,8.957 24.551,9.947 24.551,10.391 22.316,12.627 22.316,23.97 27.757,29.411 30.919,29.411 30.94,29.391 32.727,29.391 32.945,29.609 v1(32.975,29.609)
GMAC0_RXD3: BTB_1.41 U8.AC31 | length 35.4
  Bottom Layer w0.156: BTB_1.41@24.051,4.843 24.051,6.602 24.051,6.68 23.959,6.772 23.921,6.772 23.833,6.86 23.833,7.272 23.921,7.36 24.15,7.36 24.238,7.448 24.238,7.86 24.15,7.948 23.921,7.948 23.833,8.036 23.833,8.448 23.921,8.536 24.15,8.536 24.238,8.625 24.238,9.037 24.15,9.125 23.921,9.125 23.833,9.213 23.833,9.625 23.921,9.713 23.959,9.713 24.051,9.805 24.051,10.155 24.051,10.218 21.935,12.335 21.935,24.158 27.446,29.669 31.012,29.669 31.042,29.639 32.476,29.639 32.698,29.86 32.835,29.998 33.297,29.998 v1(33.302,29.993)
GMAC0_RXDV_CRS: BTB_1.37 U8.AE31 | length 35.5
  Bottom Layer w0.156: BTB_1.37@22.051,4.97 22.051,9.13 20.068,11.113 20.068,21.893 20.068,24.463 20.419,24.814 26.895,31.29 28.417,31.29 32.035,31.29 32.071,31.254 32.32,31.254 v1(32.368,31.205)
GMAC0_TXCLK: BTB_1.61 R111.2 | length 2.1
  Top Layer w0.156: R111.2@23.279,2.942 23.279,2.557 23.541,2.295 v1(23.541,2.288)
  Bottom Layer w0.156: BTB_1.61@23.535,0.98 v1@23.535,2.282
GMAC0_TXCLK_R: R111.1 U8.AE33 | length 37.4
  Top Layer w0.156: R111.1@23.279,3.492 23.279,4.196 20.35,7.125 20.35,21.893 20.35,26.787 20.419,26.856 22.907,29.344 30.363,29.344 31.206,29.344 31.559,29.696 U8.AE33@31.559,30.149
GMAC0_TXD0: BTB_1.59 R112.2 | length 2
  Top Layer w0.156: v1(24.541,2.288) 24.57,2.318 24.57,2.913 R112.2@24.6,2.942
  Bottom Layer w0.156: BTB_1.59@24.535,0.98 v1@24.535,2.282
GMAC0_TXD0_R: R112.1 U8.AD33 | length 37.6
  Top Layer w0.156: R112.1@24.6,3.492 24.6,4.541 23.917,5.224 23.862,5.279 23.732,5.279 23.68,5.227 23.555,5.227 23.264,5.518 23.264,5.643 23.494,5.873 23.494,5.998 23.203,6.289 23.078,6.289 22.848,6.059 22.723,6.059 22.432,6.35 22.432,6.475 22.484,6.527 22.484,6.657 22.207,6.934 22.151,6.99 21.422,7.719 21.422,26.48 23.77,28.828 31.61,28.828 32.019,29.237 U8.AD33@32.019,29.689
GMAC0_TXD1: BTB_1.60 R113.2 | length 2
  Bottom Layer w0.156: v1(23.939,2.946) 23.966,2.92 23.966,2.487 24.044,2.409 BTB_1.60@24.044,0.988
GMAC0_TXD1_R: R113.1 U8.AD34 | length 37.4
  Top Layer w0.156: R113.1@23.939,3.496 23.939,4.432 23.325,5.046 23.27,5.101 23.14,5.101 23.044,5.005 22.919,5.005 22.628,5.296 22.628,5.421 22.75,5.542 22.75,5.667 22.458,5.958 22.334,5.958 22.212,5.837 22.087,5.837 21.796,6.128 21.796,6.253 22.075,6.531 22.075,6.656 21.783,6.947 21.659,6.947 21.606,6.895 21.477,6.895 21.372,7 21.316,7.055 20.939,7.432 20.939,26.678 23.347,29.086 31.377,29.086 31.521,29.229 U8.AD34@31.559,29.229
GMAC0_TXD2: BTB_1.57 R101.2 | length 2.1
  Top Layer w0.156: v1(25.567,2.303) 25.567,2.307 25.85,2.59 25.85,2.926 R101.2@25.87,2.946
  Bottom Layer w0.156: BTB_1.57@25.544,0.988 25.559,1.003 25.559,2.295 v1(25.567,2.303)
GMAC0_TXD2_R: R101.1 U8.AC33 | length 37.3
  Top Layer w0.156: R101.1@25.971,3.496 25.971,4.643 25.163,5.451 25.108,5.506 24.978,5.507 24.926,5.454 24.801,5.454 24.51,5.745 24.51,5.87 24.744,6.104 24.744,6.229 24.453,6.52 24.328,6.52 24.094,6.286 23.969,6.286 23.678,6.577 23.678,6.702 23.912,6.936 23.912,7.061 23.621,7.352 23.496,7.352 23.444,7.3 23.314,7.3 23.01,7.604 22.955,7.66 22.481,8.133 22.481,26.333 24.46,28.312 32.013,28.312 32.478,28.777 U8.AC33@32.478,29.229
GMAC0_TXD3: BTB_1.58 R102.2 | length 2.1
  Bottom Layer w0.156: BTB_1.58@25.044,0.988 24.997,1.035 24.997,2.103 24.983,2.118 24.983,2.595 25.286,2.898 v1(25.286,2.942)
GMAC0_TXD3_R: R102.1 U8.AC34 | length 37.4
  Top Layer w0.156: R102.1@25.286,3.492 25.286,4.572 21.93,7.928 21.93,8.159 21.93,8.237 21.838,8.329 21.817,8.329 21.728,8.417 21.728,8.829 21.817,8.917 22.062,8.917 22.15,9.005 22.15,9.417 22.062,9.505 21.817,9.505 21.728,9.593 21.728,10.005 21.817,10.094 22.062,10.094 22.15,10.182 22.15,10.594 22.062,10.682 21.817,10.682 21.728,10.77 21.728,11.182 21.817,11.27 22.062,11.27 22.15,11.358 22.15,11.77 22.062,11.858 21.817,11.858 21.728,11.947 21.728,12.358 21.817,12.447 21.838,12.447 21.93,12.538 21.93,12.994 21.93,26.284 24.215,28.57 31.78,28.57 31.98,28.77 U8.AC34@32.019,28.77
GMAC0_TXEN: BTB_1.62 R114.2 | length 2.1
  Bottom Layer w0.156: v1(22.619,2.942) 23.044,2.517 BTB_1.62@23.044,0.988
GMAC0_TXEN_R: R114.1 U8.AE34 | length 37.4
  Top Layer w0.156: R114.1@22.619,3.492 22.619,3.942 22.27,4.29 21.945,4.29 21.706,4.529 21.706,4.854 21.514,5.046 21.09,5.046 20.942,5.195 20.942,5.619 19.832,6.729 19.832,26.942 22.491,29.602 30.818,29.602 30.878,29.662 31.072,29.662 U8.AE34@31.1,29.689

## Text inside footprints (layer, text, board x,y; h text height)
U1: Mechanical 18 "4" at 8.192,51.239 h0.18; Mechanical 18 "2" at 8.192,51.939 h0.18; Mechanical 18 "3" at 8.192,51.589 h0.18; Mechanical 18 "69" at 11.794,49.489 h0.18; Mechanical 18 "49" at 15.294,51.589 h0.18; Mechanical 18 "40" at 15.294,48.439 h0.18; Mechanical 18 "61" at 11.444,52.989 h0.18; Mechanical 18 "37" at 15.294,47.389 h0.18; Mechanical 18 "67" at 9.344,52.989 h0.18; Mechanical 18 "39" at 15.294,48.089 h0.18; Mechanical 18 "32" at 13.894,45.988 h0.18; Mechanical 18 "31" at 13.544,45.988 h0.18; Mechanical 18 "45" at 15.294,50.189 h0.18; Mechanical 18 "19" at 9.344,45.988 h0.18; Mechanical 18 "29" at 12.844,45.988 h0.18; Mechanical 18 "50" at 15.294,51.939 h0.18; Mechanical 18 "51" at 15.294,52.289 h0.18; Mechanical 18 "46" at 15.294,50.539 h0.18; Mechanical 18 "68" at 8.994,52.989 h0.18; Mechanical 18 "63" at 10.744,52.989 h0.18; Mechanical 18 "6" at 8.192,50.539 h0.18; Mechanical 18 "13" at 8.293,48.089 h0.18; Mechanical 18 "9" at 8.192,49.489 h0.18; Mechanical 18 "26" at 11.794,45.988 h0.18; Mechanical 18 "42" at 15.294,49.139 h0.18; Mechanical 18 "30" at 13.194,45.988 h0.18; Mechanical 18 "23" at 10.744,45.988 h0.18; Mechanical 18 "55" at 13.544,52.989 h0.18; Mechanical 18 "35" at 15.294,46.689 h0.18; Mechanical 18 "36" at 15.294,47.039 h0.18; Mechanical 18 "5" at 8.192,50.889 h0.18; Mechanical 18 "25" at 11.444,45.988 h0.18; Mechanical 18 "41" at 15.294,48.789 h0.18; Mechanical 18 "66" at 9.694,52.989 h0.18; Mechanical 18 "59" at 12.144,52.989 h0.18; Mechanical 18 "20" at 9.694,45.988 h0.18; Mechanical 18 "60" at 11.794,52.989 h0.18; Mechanical 18 "58" at 12.494,52.989 h0.18; Mechanical 18 "65" at 10.044,52.989 h0.18; Mechanical 18 "14" at 8.293,47.739 h0.18; Mechanical 18 "12" at 8.293,48.439 h0.18; Mechanical 18 "10" at 8.293,49.139 h0.18; Mechanical 18 "8" at 8.192,49.839 h0.18; Mechanical 18 "11" at 8.293,48.789 h0.18; Mechanical 18 "16" at 8.293,47.039 h0.18; Mechanical 18 "18" at 8.994,45.988 h0.18; Mechanical 18 "62" at 11.094,52.989 h0.18; Mechanical 18 "15" at 8.293,47.389 h0.18; Mechanical 18 "17" at 8.293,46.689 h0.18; Mechanical 18 "47" at 15.294,50.889 h0.18; Mechanical 18 "22" at 10.394,45.988 h0.18; Mechanical 18 "21" at 10.044,45.988 h0.18; Mechanical 18 "27" at 12.144,45.988 h0.18; Mechanical 18 "28" at 12.494,45.988 h0.18; Mechanical 18 "34" at 14.594,45.988 h0.18; Mechanical 18 "33" at 14.244,45.988 h0.18; Mechanical 18 "44" at 15.294,49.839 h0.18; Mechanical 18 "43" at 15.294,49.489 h0.18; Mechanical 18 "7" at 8.192,50.189 h0.18; Mechanical 18 "1" at 8.192,52.289 h0.18; Mechanical 18 "64" at 10.394,52.989 h0.18; Mechanical 18 "52" at 14.594,52.989 h0.18; Mechanical 18 "53" at 14.244,52.989 h0.18; Mechanical 18 "54" at 13.894,52.989 h0.18; Mechanical 18 "57" at 12.844,52.989 h0.18; Mechanical 18 "38" at 15.294,47.739 h0.18; Mechanical 18 "48" at 15.294,51.239 h0.18; Mechanical 18 "24" at 11.094,45.988 h0.18; Mechanical 18 "56" at 13.194,52.989 h0.18; Top Assembly "RK806-1" at 12.302,49.616 h0.18 r180